# Altium PCB PowerDistribution.PcbDoc
Units mm, origin at the board's own origin, x right, y up, seen from the top; angles counter-clockwise.
Board outline 99.75 x 90.5 mm, 4 copper layers (Top Layer, Int1 (GND), Int2 (PWR), Bottom Layer), stack 1.509 mm thick; 8 components, 4 nets, 67 pads, 5 vias.
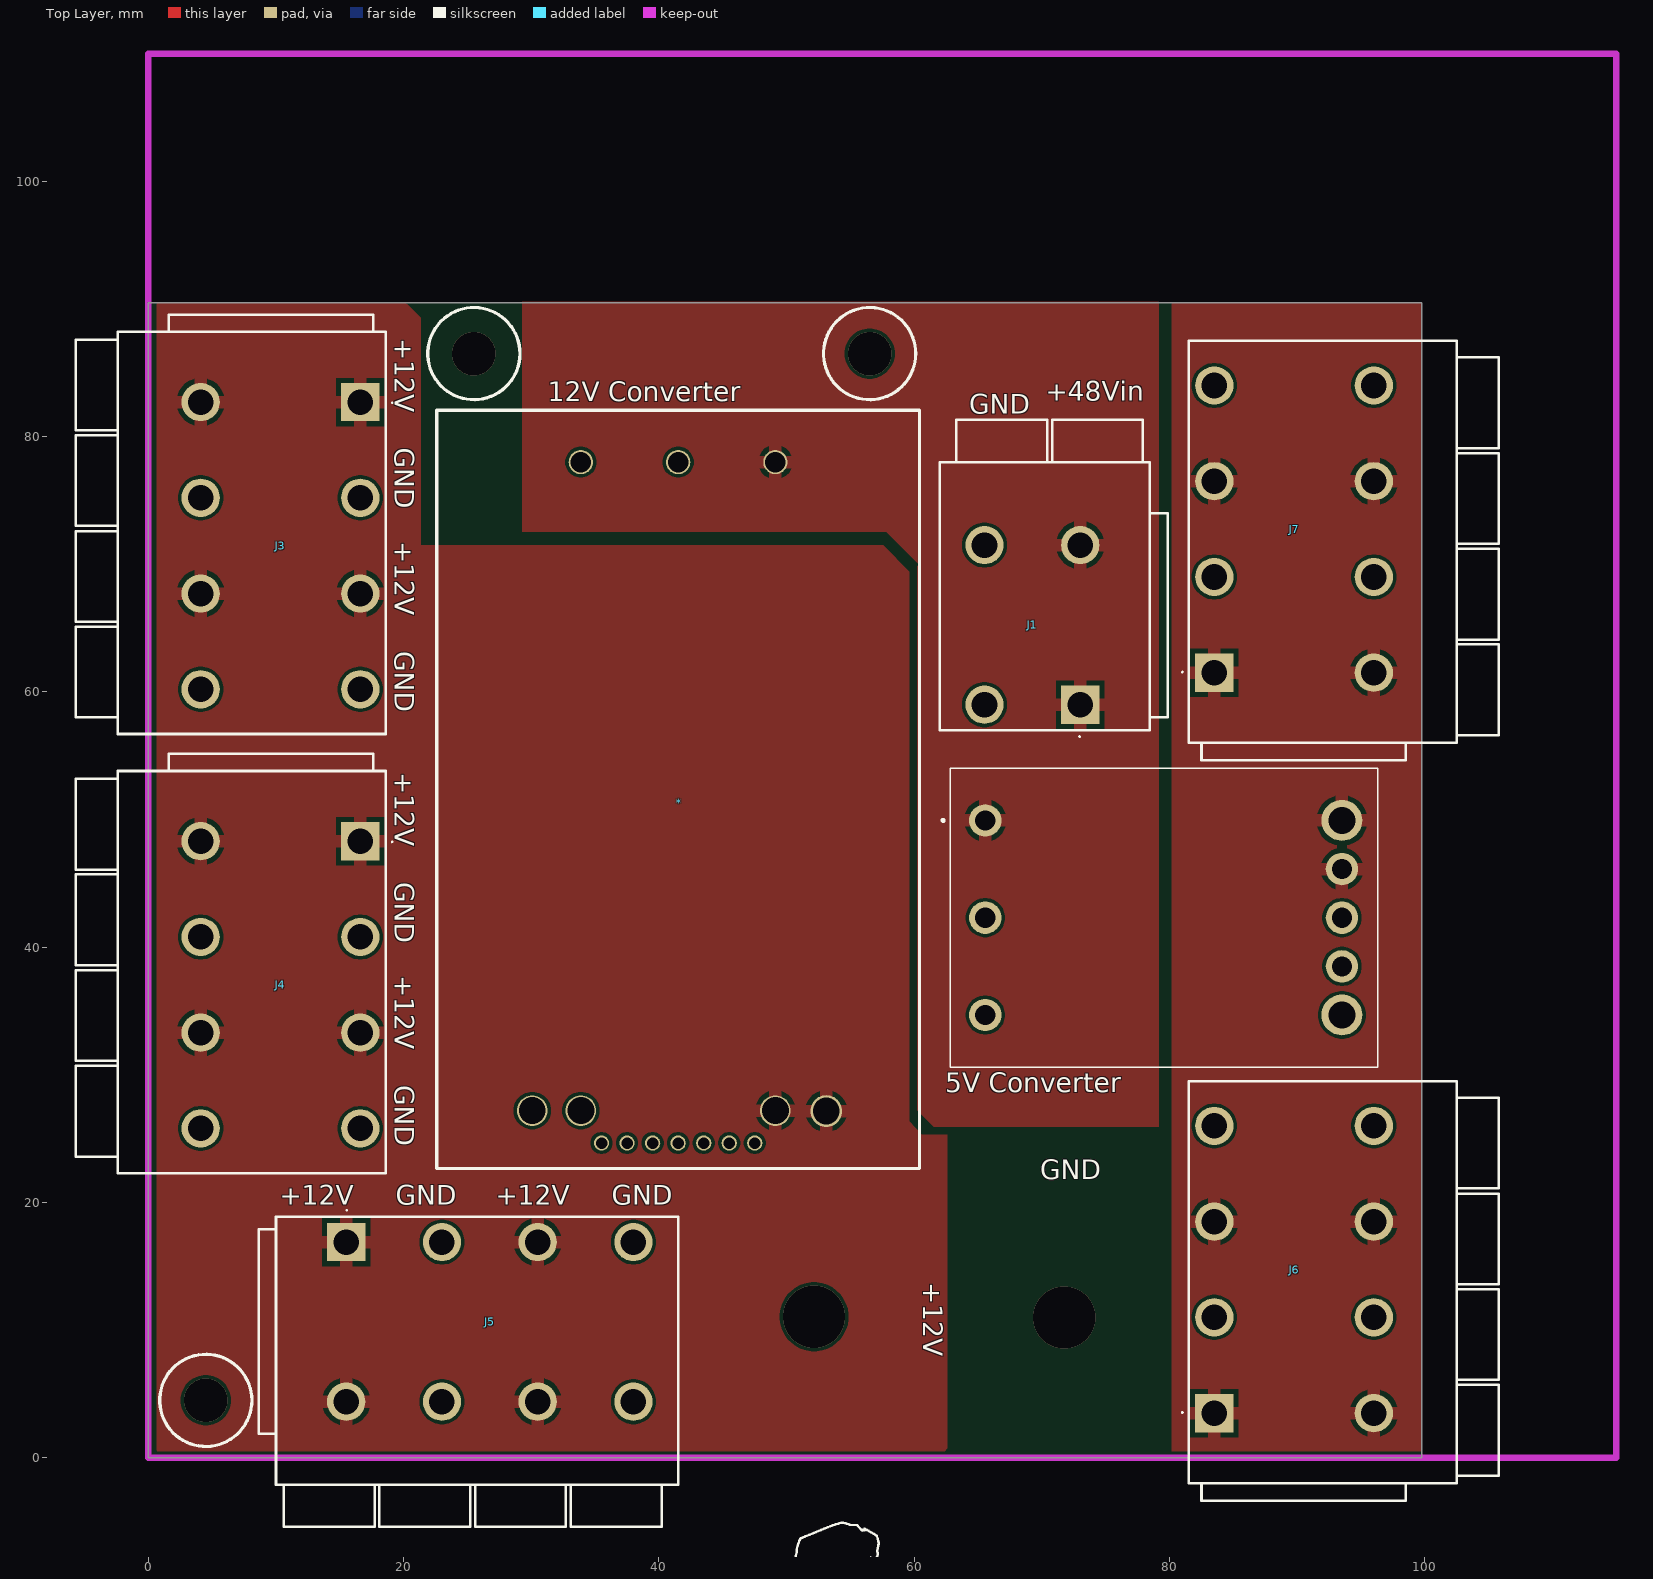
[diagram p0: Top Layer view]
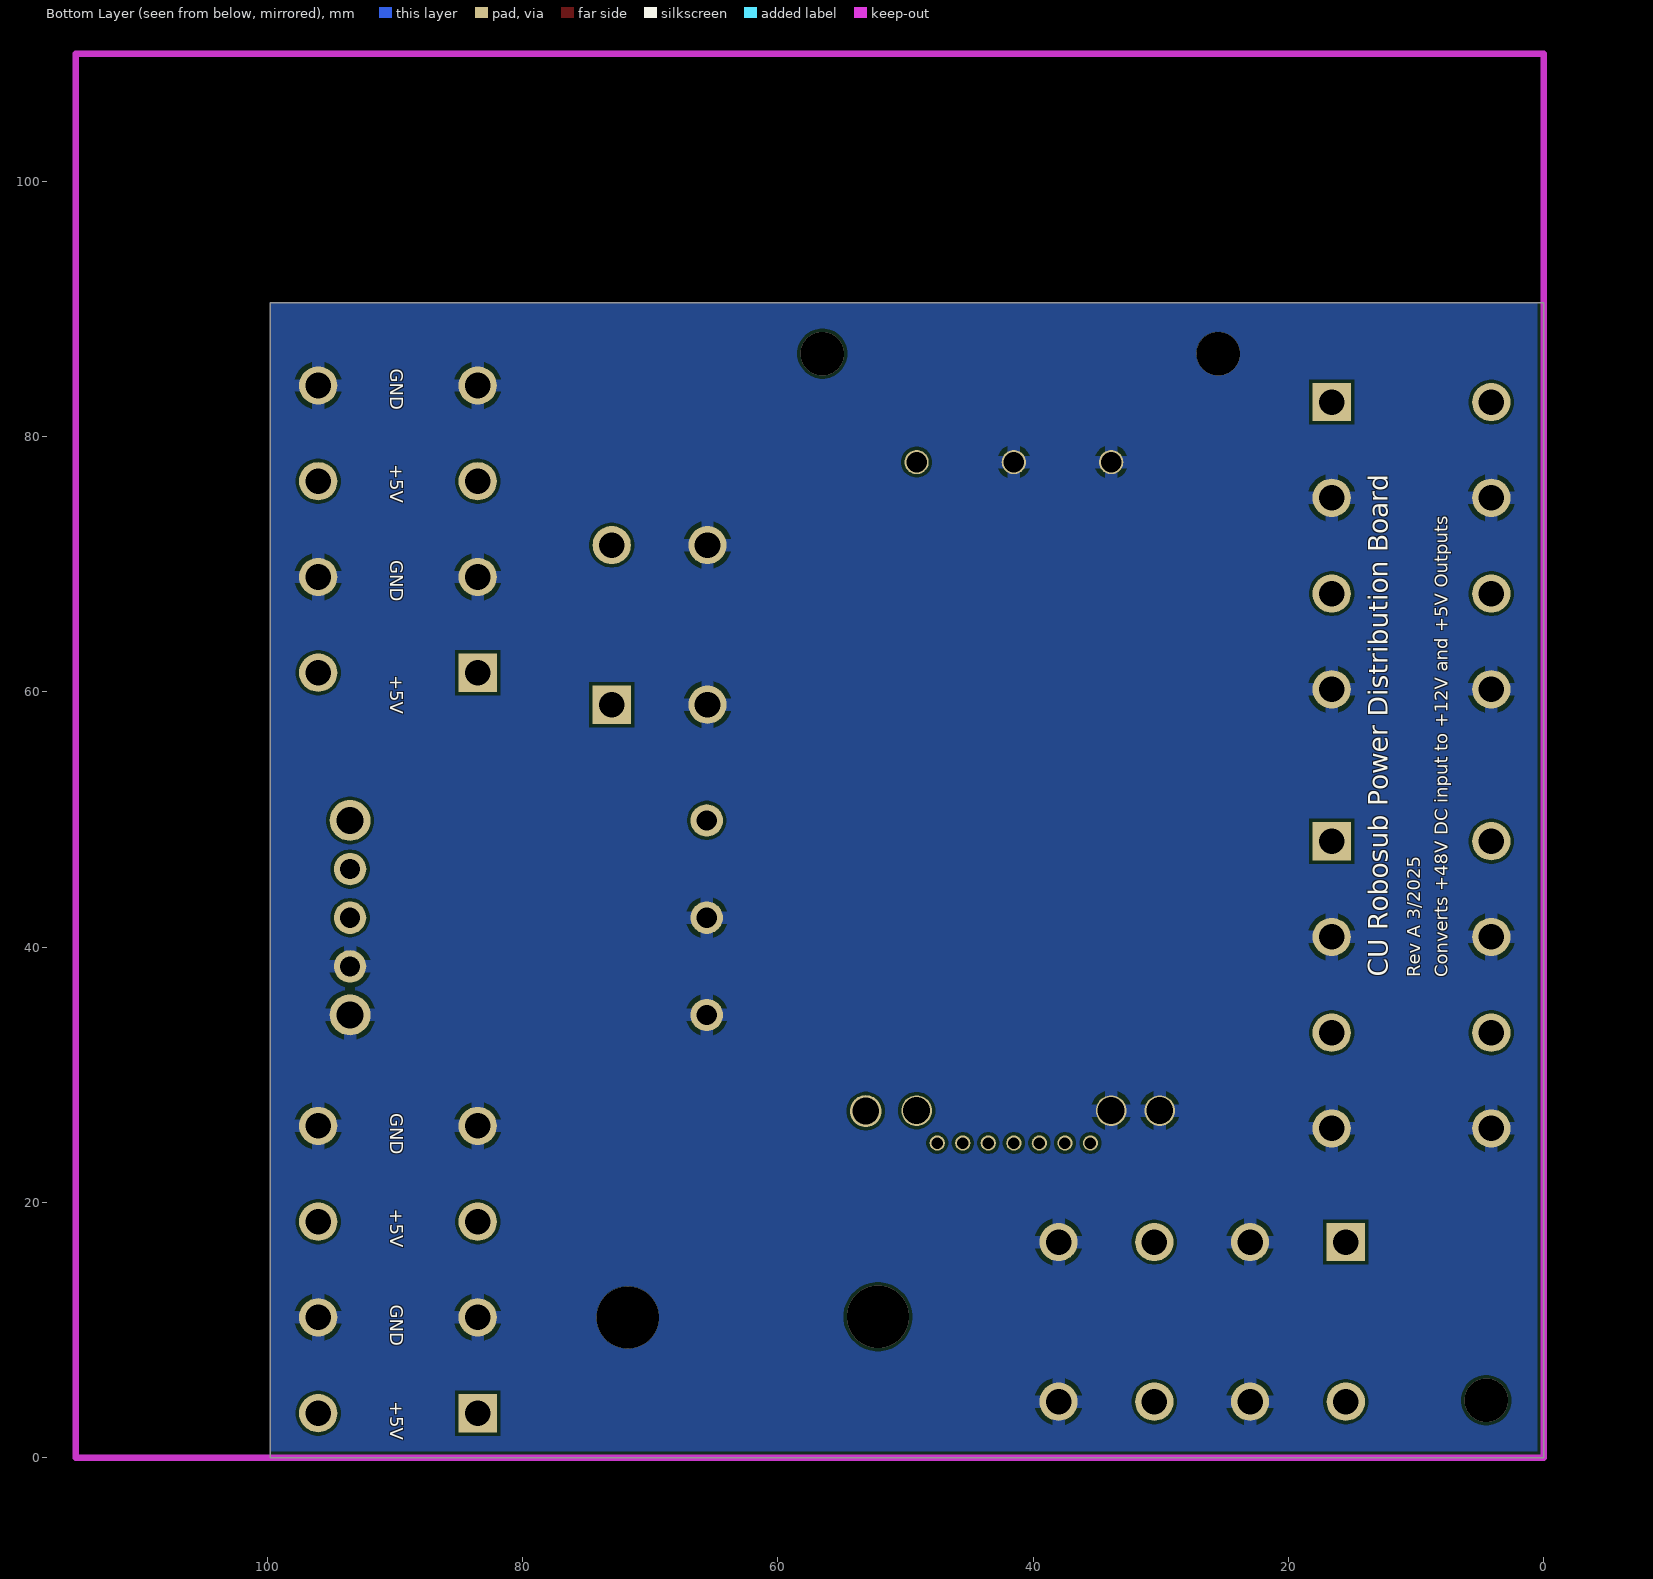
[diagram p1: Bottom Layer view, seen from below]
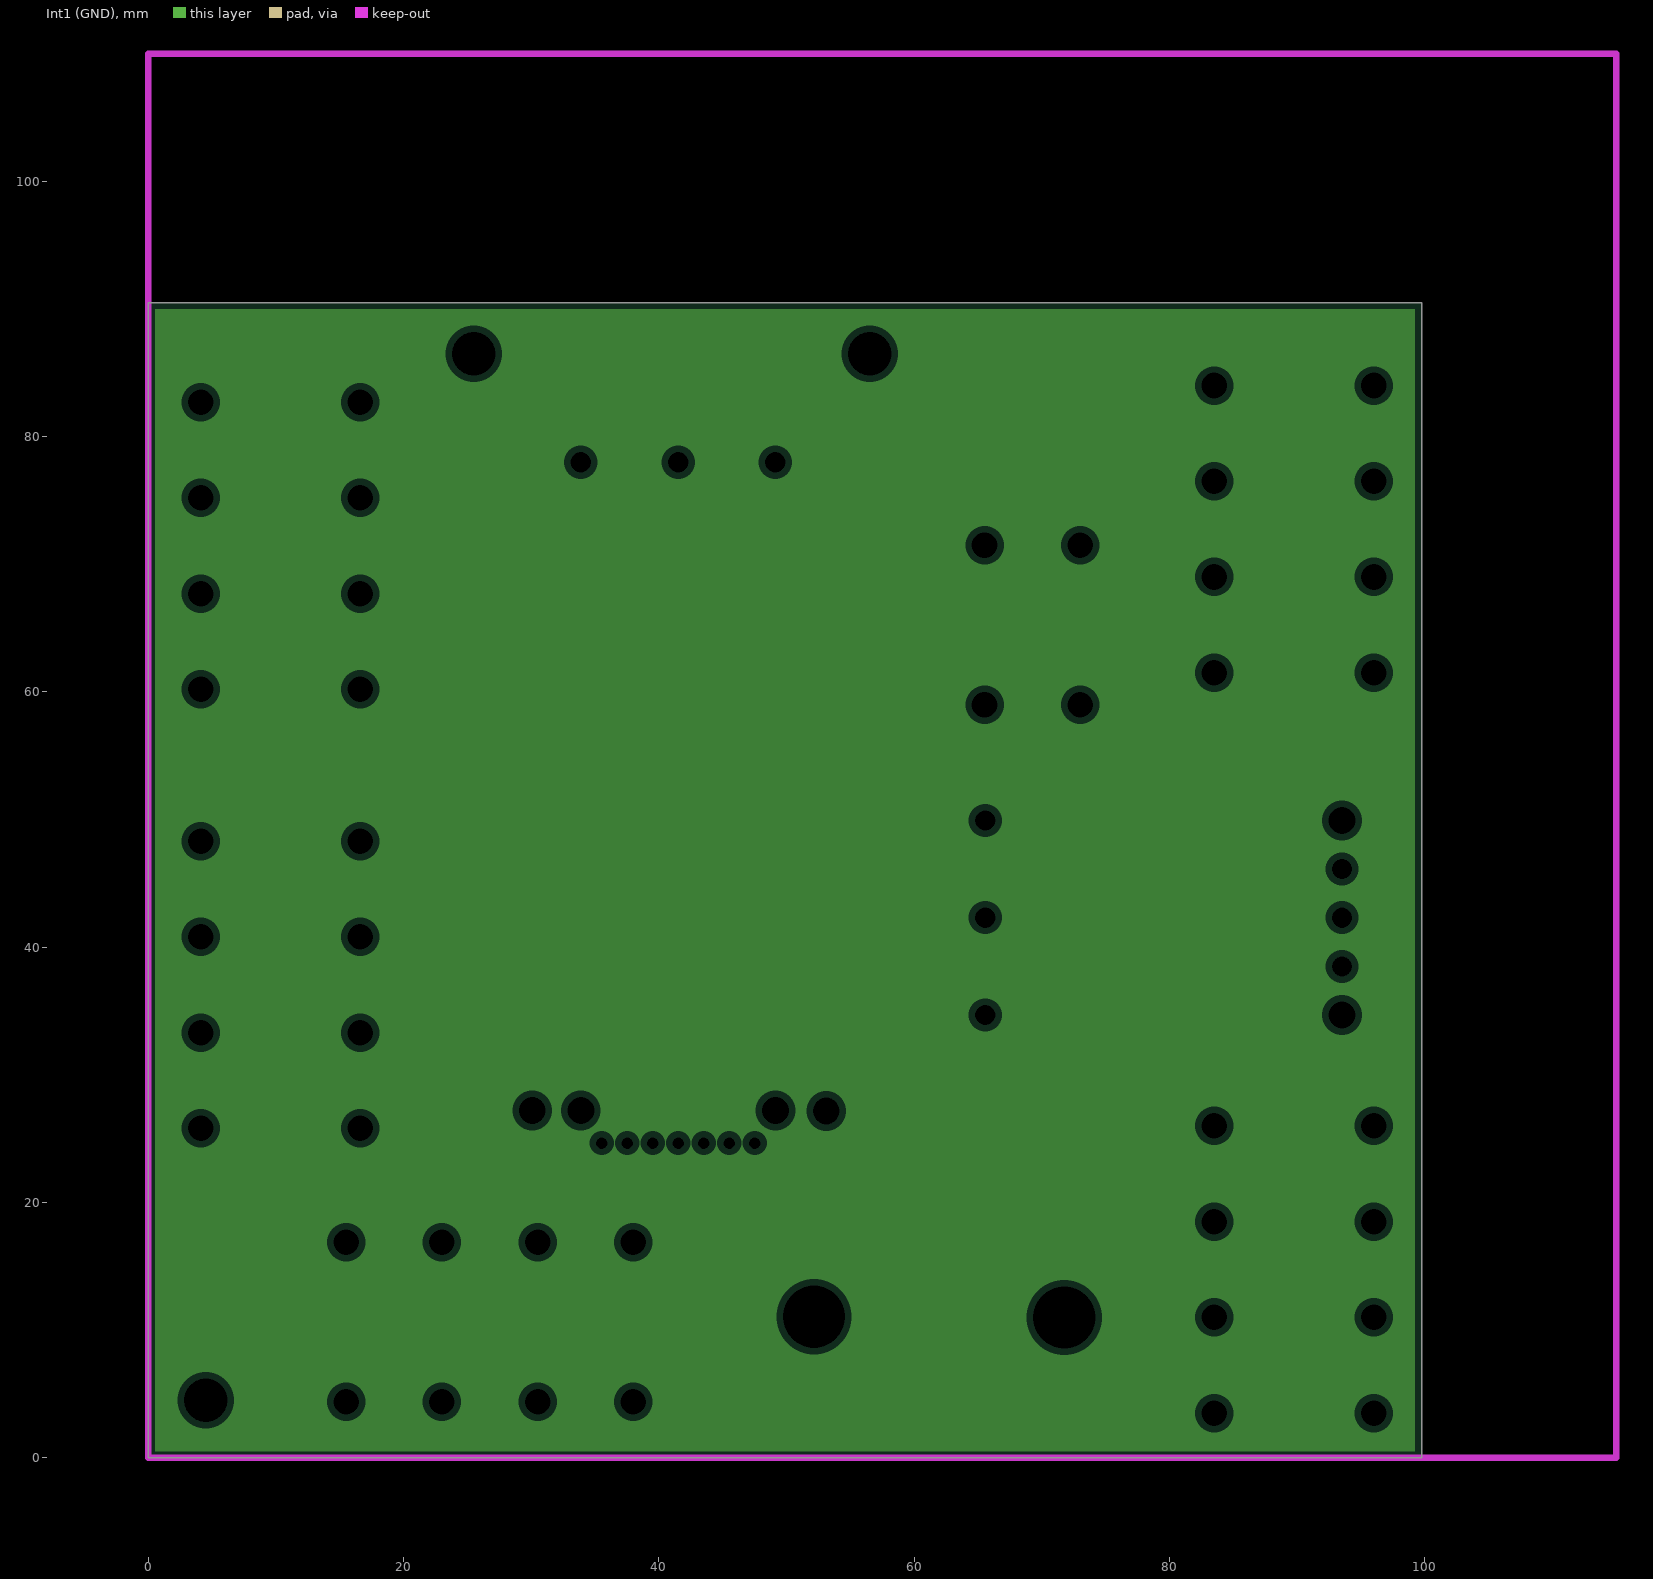
[diagram p2: Int1 (GND), clearances drawn from the general rule]
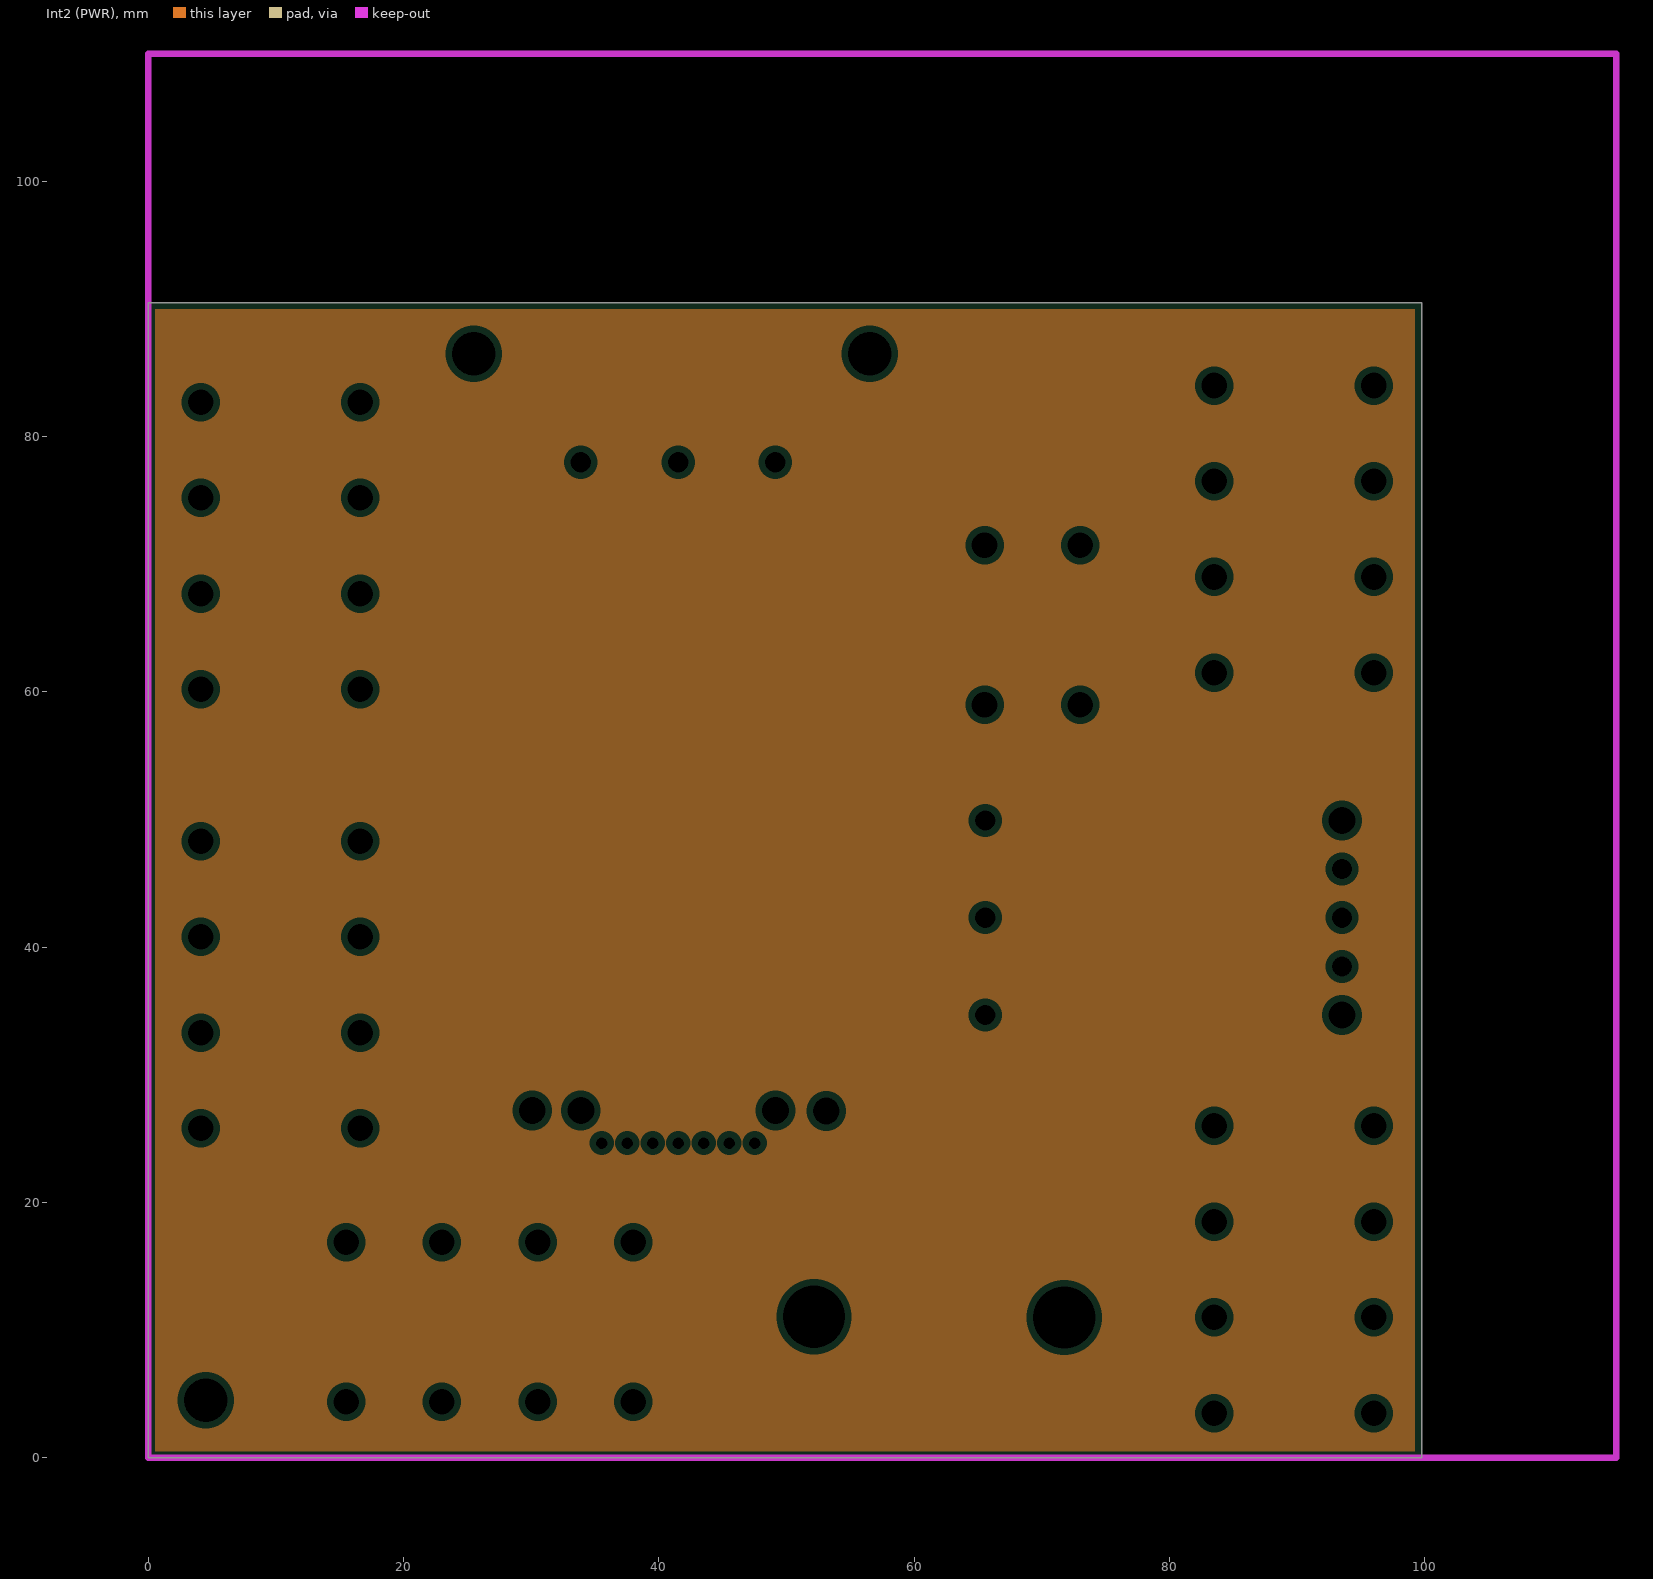
[diagram p3: Int2 (PWR), clearances drawn from the general rule]
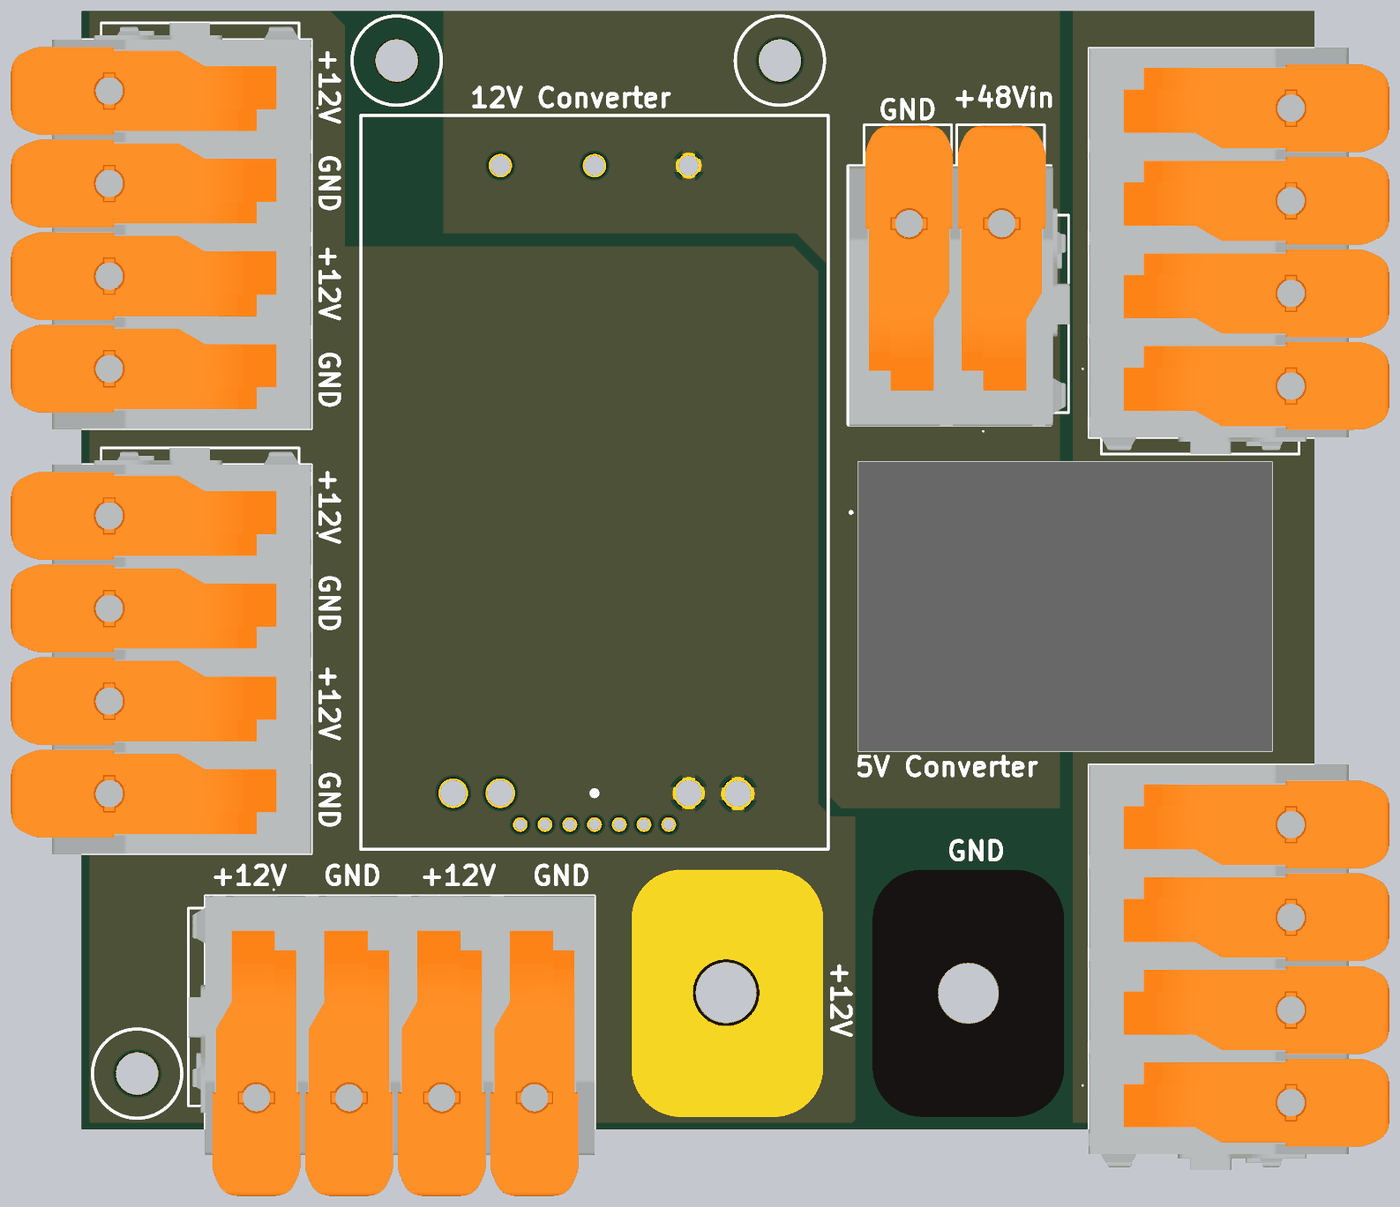
[diagram p4: 3D render of the assembled board from above, using the file's embedded part models]

## Layer stack, top to bottom
Top Solder: solder mask 0.0254, SM-001, Dk 4
Top Layer: signal copper 0.07
Dielectric 1: prepreg 0.1295, PP-017, Dk 4.3
Dielectric 2: prepreg 0.1295, PP-017, Dk 4.3
Int1 (GND): plane copper 0.07
Dielectric 3: core 0.7112, Core-039, Dk 4.8
Int2 (PWR): plane copper 0.07
Dielectric 4: prepreg 0.1295, PP-017, Dk 4.3
Dielectric 5: prepreg 0.1295, PP-017, Dk 4.3
Bottom Layer: signal copper 0.07
Bottom Solder: solder mask 0.0254, SM-001, Dk 4

## Board outline
0,0 99.75,0 99.75,90.5 0,90.5

## Design rules (kind name [scope] priority, off if disabled: settings)
Clearance [All] p1: gap=0.254 ignorepadtopadclearanceinfootprint=FALSE
PlaneClearance [All] p1: clearance=0.508
PlaneConnect [All] p1: planeconnectstyle=Relief reliefexpansion=0.508 reliefentries=4 reliefconductorwidth=0.254 reliefairgap=0.254
PolygonConnect PolygonConnect_4 [All vs IsNamedPolygon('+OUT12V_L01_P002')] p1: thpad.connectstyle=Relief thpad.reliefconductorwidth=1.016 thpad.reliefentries=4 thpad.polygonreliefangle="90 Angle" thpad.airgapwidth=0.381 smdpad.connectstyle=Relief smdpad.reliefconductorwidth=0.254 smdpad.reliefentries=4 smdpad.polygonreliefangle="90 Angle" smdpad.airgapwidth=0.254 via.connectstyle=Relief via.reliefconductorwidth=0.254 via.reliefentries=4 via.polygonreliefangle="90 Angle" via.airgapwidth=0.254
PolygonConnect PolygonConnect_3 [All vs IsNamedPolygon('+OUT12V_L01_P002')] p2: thpad.connectstyle=Relief thpad.reliefconductorwidth=1.016 thpad.reliefentries=4 thpad.polygonreliefangle="90 Angle" thpad.airgapwidth=0.381 smdpad.connectstyle=Relief smdpad.reliefconductorwidth=0.254 smdpad.reliefentries=4 smdpad.polygonreliefangle="90 Angle" smdpad.airgapwidth=0.254 via.connectstyle=Relief via.reliefconductorwidth=0.254 via.reliefentries=4 via.polygonreliefangle="90 Angle" via.airgapwidth=0.254
PolygonConnect PolygonConnect_2 [All vs IsNamedPolygon('+OUT12V_L01_P002')] p3: thpad.connectstyle=Relief thpad.reliefconductorwidth=0.762 thpad.reliefentries=4 thpad.polygonreliefangle="90 Angle" thpad.airgapwidth=0.381 smdpad.connectstyle=Relief smdpad.reliefconductorwidth=0.254 smdpad.reliefentries=4 smdpad.polygonreliefangle="90 Angle" smdpad.airgapwidth=0.254 via.connectstyle=Relief via.reliefconductorwidth=0.254 via.reliefentries=4 via.polygonreliefangle="90 Angle" via.airgapwidth=0.254
PolygonConnect PolygonConnect_1 [All vs IsNamedPolygon('+OUT12V_L01_P002')] p4: thpad.connectstyle=Relief thpad.reliefconductorwidth=0.381 thpad.reliefentries=4 thpad.polygonreliefangle="90 Angle" thpad.airgapwidth=0.381 smdpad.connectstyle=Direct smdpad.reliefconductorwidth=0.254 smdpad.reliefentries=4 smdpad.polygonreliefangle="90 Angle" smdpad.airgapwidth=0.254 via.connectstyle=Direct via.reliefconductorwidth=0.254 via.reliefentries=4 via.polygonreliefangle="90 Angle" via.airgapwidth=0.254
PolygonConnect [HasFootprint('BMR4913208_857-Footprint-1')] p5: thpad.connectstyle=Relief thpad.reliefconductorwidth=0.381 thpad.reliefentries=4 thpad.polygonreliefangle="90 Angle" thpad.airgapwidth=0.381 smdpad.connectstyle=Relief smdpad.reliefconductorwidth=2.032 smdpad.reliefentries=4 smdpad.polygonreliefangle="90 Angle" smdpad.airgapwidth=0.381 via.connectstyle=Direct via.reliefconductorwidth=2.032 via.reliefentries=4 via.polygonreliefangle="90 Angle" via.airgapwidth=0.381
RoutingVias [All] p1: holewidth=0.711 width=1.27 viastyle="Through Hole" minholewidth=0.711 minwidth=1.27 maxholewidth=0.711 maxwidth=1.27
SolderMaskExpansion [All] p1: expansion=0.102 istentingtop=FALSE
SupplyNets "Schematic Supply Nets" [InNet('48VIn-')] p1: voltage=0.000
UnRoutedNet [All] p1: checkbadconnections=TRUE
Width [All] p1: maxlimit=0.254 minlimit=0.254 preferedwidth=0.254
27 further rules are at their usual default settings.

## Classes and differential pairs
component class PowerDistribution: * J1 J3 J4 J5 J6 J7

## Components (designator, comment, footprint, x,y, rotation, side; value= is the part's Value field where it differs from the comment)
* "BMR4913208/857" BMR4913208_857-Footprint-1 22.6,82.06 r270 top
J1 "2606-1102" 26061102 73,59 r180 top
J3 "2606-1104" 26061104 16.6,82.7 r270 top
J4 "" 26061104 16.6,48.3 r270 top
J5 "2606-1104" 26061104 15.5,16.9 r0 top
J6 "2606-1104" 26061104 83.5,3.5 r90 top
J7 "2606-1104" 26061104 83.5,61.5 r90 top
PS1 "IRS-12_4.5-Q48N-C" IRS1245Q48NC 65.56,49.93 r0 top

## Footprints (in the part's own frame and the unit in brackets; to place one, negate y for a bottom-side part, rotate by r counter-clockwise, add the part's x,y. Pads: shape width x height; smd on the part's side, far side on the other; paste and mask are expansions set on the pad)
26061102 [mm]
  rect 3x3 hole 2: 1(0,0)
  round 3 hole 2: 2(0,-12.5) 3(7.5,0) 4(7.5,-12.5)
  silkscreen extent -6.85,-22.3 11,2.55, body extent -6.95,-22.25 10.9,2.05, height 24
26061104 [mm]
  rect 3x3 hole 2: 1(0,0)
  round 3 hole 2: 2(0,-12.5) 3(7.5,0) 4(7.5,-12.5) 5(15,0) 6(15,-12.5) 7(22.5,0) 8(22.5,-12.5)
  silkscreen extent -6.85,-22.3 26,2.55, body extent -6.85,-22.3 26,2, height 24
BMR4913208_857-Footprint-1 [mm]
  round 1.9 hole 1.6: 1(4.06,26.52) 2(4.06,18.9) 3(4.06,11.28)
  round 2.4 hole 2.1: 4(54.86,7.47) 5(54.86,11.28) 7(54.86,26.52)
  round 0.8 on Top Overlay: 6(54.86,18.9)
  round 2.5 hole 2.1: 8(54.9,30.5)
  round 1.2 hole 0.9: 9(57.4,12.9) 10(57.4,14.9) 11(57.4,16.9) 12(57.4,18.9) 13(57.4,20.9) 14(57.4,22.9) 15(57.4,24.9)
  silkscreen extent 0,0 59.4,37.8
IRS1245Q48NC [mil]
  round 100 hole 62: 1(0,0) 2(0,-300) 3(0,-600) 5(1100,-450) 6(1100,-300) 7(1100,-150)
  round 125.98 hole 84: 4(1100,-600) 8(1100,0)
  silkscreen extent -134,-761 1211,161, body extent -108,-761 1211,161, height 524

## Part data
*: library part CMP-019-00049-3, "48-60VIN; 12VOUT; 1540W; 2450W P"
J1 J6 J7: "Connector", Manufacturer_Name=Wago, Height=24mm
  J1: Datasheet Link=https://www.wago.com/global/pcb-terminal-blocks-and-pluggable-connectors/pcb-terminal-block/p/2606-1102, Manufacturer_Part_Number=2606-1102
  J6 J7: Datasheet Link=https://www.wago.com/2606-1104, Manufacturer_Part_Number=2606-1104
J3: "Connector - Light and DVL", Manufacturer_Name=Wago, Datasheet Link=https://www.wago.com/2606-1104, Height=24mm, Manufacturer_Part_Number=2606-1104
J4: library part 2606-1104, "Connector - Gripper and Jetson", Manufacturer_Name=Wago, Datasheet Link=https://www.wago.com/2606-1104, Height=24mm, Manufacturer_Part_Number=2606-1104
J5: "Connector - Extra", Manufacturer_Name=Wago, Datasheet Link=https://www.wago.com/2606-1104, Height=24mm, Manufacturer_Part_Number=2606-1104
PS1: "Power Supply", Arrow Part Number=IRS-12/4.5-Q48N-C, Manufacturer_Name="Murata Electronics", Mouser Part Number=580-IRS12/4.5-Q48NC, Arrow Price/Stock=https://www.arrow.com/en/products/irs-124.5-q48n-c/murata-power-solutions?region=nac, Datasheet Link=https://power.murata.com/data/power/irs-q48.pdf, Height=13.2mm, Manufacturer_Part_Number=IRS-12/4.5-Q48N-C, Mouser Price/Stock=https://www.mouser.co.uk/ProductDetail/Murata-Power-Solutions/IRS-12-4.5-Q48N-C?qs=f9yNj16SXrJShYYebNX1QA%3D%3D

## Via types
v1: diameter 3.4, hole 3.4, Top Layer to Bottom Layer, 3 vias
v2: diameter 4.877, hole 4.877, Top Layer to Bottom Layer, 2 vias

## Nets (pads, with @x,y where several pads share a name; then routed paths per layer and width w, separated by ;. In a path a pad name is that pad's centre, name@x,y a point inside that pad or via, vN(x,y) a via of type N, cw(c..) or ccw(c..) an arc to the next point about the centre after c; other vN are vias at no path point)
48VIn+: *.1 J1.1 J1.2 PS1.1
48VIn-: *.2 *.3 *.4 *.5 J1.3 J1.4 J3.3 J3.4 J3.7 J3.8 J4.3 J4.4 J4.7 J4.8 J5.3 J5.4 J5.7 J5.8 J6.3 J6.4 J6.7 J6.8 J7.3 J7.4 J7.7 J7.8 PS1.2 PS1.3 PS1.4 PS1.5
  other v1: 25.5,86.5
  other v2: 71.75,11
+Out5V: J6.1 J6.2 J6.5 J6.6 J7.1 J7.2 J7.5 J7.6 PS1.7 PS1.8
+Out12V: *.7 *.8 J3.1 J3.2 J3.5 J3.6 J4.1 J4.2 J4.5 J4.6 J5.1 J5.2 J5.5 J5.6
pads on no net: *.6 *.9 *.10 *.11 *.12 *.13 *.14 *.15 PS1.6
copper on no net:
  other v1: 4.5,4.5 56.5,86.5
  other v2: 52.15,11.05

## Polygon pours and split planes (outlines as drawn)
48VIn+ on Top Layer "NONET_L01_P-001" (solid, pour order 5): 29.3,90.55 29.275,90.525 29.275,72.525 57.8,72.525 60.375,69.95 60.25,69.825 60.25,27.225 61.525,25.95 79.15,25.95 79.15,90.5 79.1,90.55 31.575,90.55
+Out5V on Top Layer "+OUT5V_L01_P003" (solid, pour order 3): 99.75,0.347 99.75,90.5 80.175,90.5 80.175,0.347
+Out12V on Top Layer "NONET_L01_P-001" (solid, pour order 4): 22.752,22.75 59.55,22.75 59.55,33.825 22.752,33.825
+Out12V on Top Layer "+OUT12V_L01_P002" (solid, pour order 2): 61.85,0 62.6,0.75 62.6,25.325 60.6,25.325 59.6,26.375 59.6,69.425 57.55,71.475 21.325,71.475 21.325,89.3 20.15,90.475 0.65,90.475 0.65,0.65 0,0
48VIn- on Bottom Layer "48VIN-_L04_P001" (solid, pour order 1): 0,90.5 99.75,90.5 99.75,0 0,0
no net on Int2 (PWR) (split plane): 99.24,0.51 0.51,0.51 0.51,89.99 99.24,89.99
no net on Int1 (GND) (split plane): 99.24,0.51 0.51,0.51 0.51,89.99 99.24,89.99

## Keep-outs
Keep-Out Layer:
  lines w0.508: 0,0 0,110 115,110 115,0 0,0

## Silkscreen, mask and mechanical layers (free items; w line width, h text height)
Top Overlay:
  drawing of 35 lines, arcs and shapes, not listed
  text "+12V" at 19.305,87.695 h1.52 r270
  text "+48Vin" at 70.305,82.805 h1.52
  text "12V Converter" at 31.28,82.78 h1.52
  text "GND" at 64.305,81.805 h1.52
  text "GND" at 19.305,79.105 h1.52 r270
  text "+12V" at 19.305,71.785 h1.52 r270
  text "GND" at 19.305,63.195 h1.52 r270
  text "+12V" at 19.305,53.695 h1.52 r270
  text "GND" at 19.305,45.105 h1.52 r270
  text "+12V" at 19.305,37.785 h1.52 r270
  text "GND" at 19.305,29.195 h1.52 r270
  text "5V Converter" at 62.43,28.63 h1.52
  text "GND" at 69.855,21.805 h1.52
  text "+12V" at 10.305,19.805 h1.52
  text "GND" at 19.395,19.805 h1.52
  text "+12V" at 27.215,19.805 h1.52
  text "GND" at 36.305,19.805 h1.52
  text "+12V" at 60.705,13.77 h1.52 r270
Bottom Overlay:
  text "GND" at 90.346,85.321 h1.02 r90
  text "+5V" at 90.346,77.823 h1.02 r90
  text "GND" at 90.346,70.325 h1.02 r90
  text "+5V" at 90.346,61.321 h1.02 r90
  text "CU Robosub Power Distribution Board" at 12.23,37.68 h1.52 r270
  text "Converts +48V DC input to +12V and +5V Outputs" at 7.518,37.629 h1.02 r270
  text "Rev A 3/2025" at 9.679,37.629 h1.02 r270
  text "GND" at 90.346,26.996 h1.02 r90
  text "+5V" at 90.346,19.498 h1.02 r90
  text "GND" at 90.346,12 h1.02 r90
  text "+5V" at 90.346,4.446 h1.02 r90
Top Solder:
  lines w8: 48.5,5 56,5 56,17 48.5,17 48.5,5 ; 68,5 75.5,5 75.5,17 68,17 68,5